# Altium PCB FPGA_Peripheral_Board.PcbDoc (part 3 of 5)
Units mm, origin at the board's own origin, x right, y up, seen from the top; angles counter-clockwise.
Board outline 78.8 x 69 mm, 4 copper layers (Top Layer, Int1 (GND), Int2 (PWR), Bottom Layer), stack 1.508 mm thick; 111 components, 280 nets, 1262 pads, 728 vias.
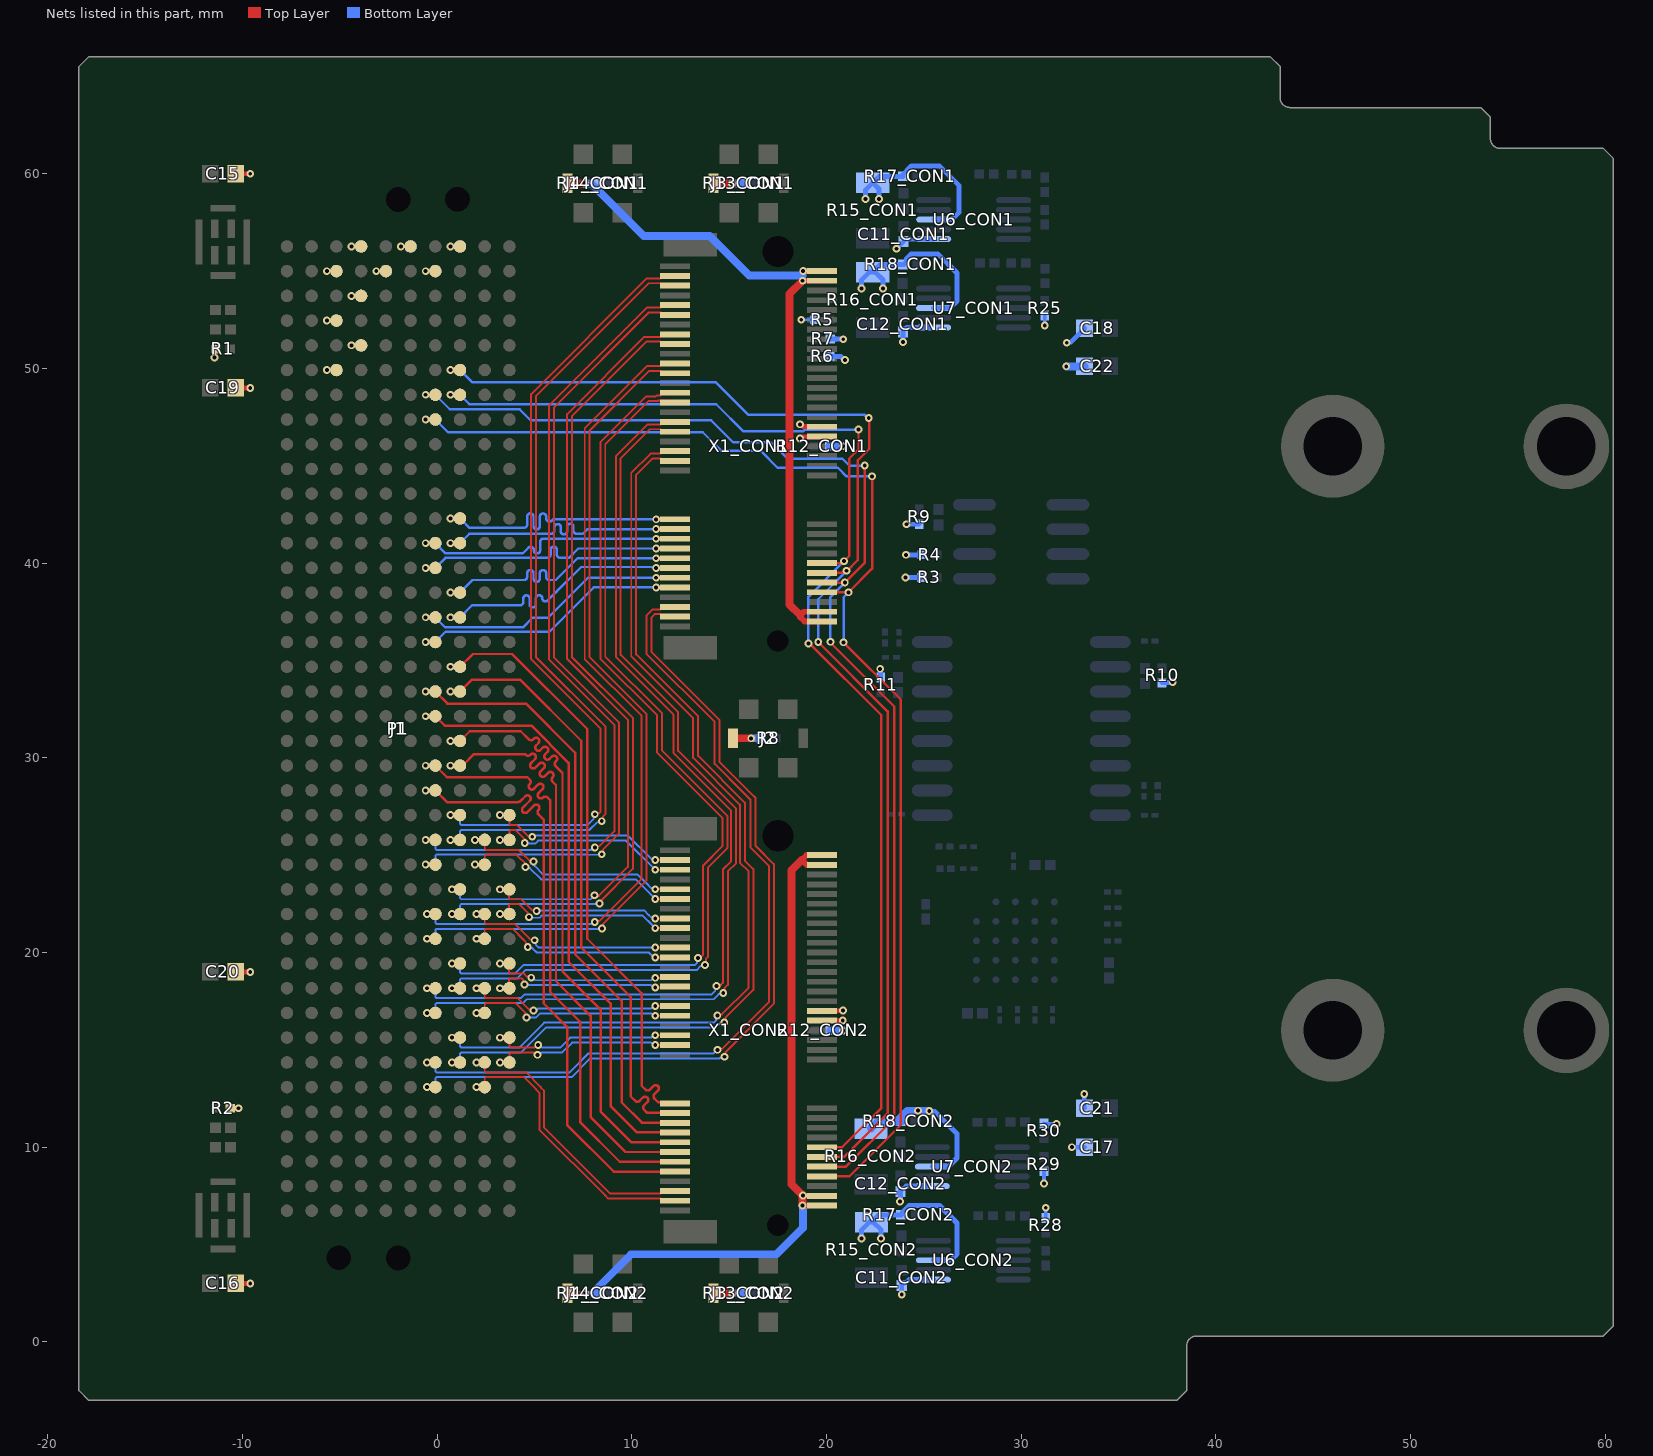
[diagram p4: the nets of this part, all layers, seen from the top]

## Via types
v1: diameter 0.4, hole 0.2, Top Layer to Bottom Layer, tented both sides, 713 vias
v2: diameter 3.5, hole 2.2, Top Layer to Bottom Layer, 11 vias
v3: diameter 5, hole 2.7, Top Layer to Bottom Layer, tented both sides, 2 vias
v4: diameter 3, hole 2.7, Top Layer to Bottom Layer, 1 vias
v5: diameter 3, hole 2.7, Top Layer to Bottom Layer, tented both sides, 1 vias

## Nets (pads, with @x,y where several pads share a name; then routed paths per layer and width w, separated by ;. In a path a pad name is that pad's centre, name@x,y a point inside that pad or via, vN(x,y) a via of type N, cw(c..) or ccw(c..) an arc to the next point about the centre after c; other vN are vias at no path point) (continued)
CON1_GP_D_P5: (continued)
  Bottom Layer w0.1: P1.H13@1.175,21.975 1.175,22.426 1.234,22.485 8.315,22.485 v1(8.34,22.509)
  other v1: 0.763,21.975
CON1_GP_D_P6: J1.G15 P1.G15 X1_CON1.65 | length 42
  Top Layer w0.1: v1(8.454,25.046) 8.511,25.104 8.511,25.281 9.352,26.121 9.352,31.799 6.003,35.148 6.003,47.996 10.881,52.875 11.475,52.875 11.6,52.75 X1_CON1.65@12.225,52.75
  Bottom Layer w0.1: P1.G15@-0.095,24.515 -0.095,24.966 -0.036,25.025 7.7,25.025 7.705,25.02 8.427,25.02 v1(8.454,25.046)
  other v1: -0.59,24.515
CON1_GP_D_P7: J1.H16 P1.H16 X1_CON1.71 | length 40.9
  Top Layer w0.1: v1(8.454,26.746) 8.511,26.804 8.511,26.981 8.65,27.12 8.65,31.602 5.075,35.177 5.075,48.582 10.868,54.375 11.475,54.375 11.6,54.25 X1_CON1.71@12.225,54.25
  Bottom Layer w0.1: P1.H16@1.175,25.785 1.175,26.236 1.234,26.295 7.825,26.295 8.219,26.689 8.396,26.689 v1(8.454,26.746)
  other v1: 0.68,25.785
CON1_GP_S0: J1.G24 P1.G24 X1_CON1.9 | length 13.5
  Top Layer w0.125: v1(11.25,38.75) X1_CON1.9@12.225,38.75
  Bottom Layer w0.125: P1.G24@-0.095,35.945 0.436,36.476 5.768,36.476 8.042,38.75 v1(11.25,38.75)
  other v1: -0.59,35.945
CON1_GP_S1: J1.G25 P1.G25 X1_CON1.11 | length 13.6
  Top Layer w0.125: v1(11.25,39.25) X1_CON1.11@12.225,39.25
  Bottom Layer w0.125: P1.G25@-0.095,37.215 0.419,36.701 4.408,36.701 4.899,37.192 5.69,37.192 7.748,39.25 v1(11.25,39.25)
  other v1: -0.59,37.215
CON1_GP_S2: J1.H25 P1.H25 X1_CON1.13 | length 13.6
  Top Layer w0.125: v1(11.25,39.75) X1_CON1.13@12.225,39.75
  Bottom Layer w0.125: P1.H25@1.175,37.215 1.793,37.833 4.2,37.833 4.263,37.833 ccw(c4.263,37.996) 4.425,37.996 4.425,38.182 cw(c4.588,38.182) 4.588,38.345 cw(c4.588,38.182) 4.75,38.182 4.75,37.884 ccw(c4.913,37.884) 4.913,37.721 ccw(c4.913,37.884) 5.075,37.884 5.075,38.192 cw(c5.238,38.192) 5.238,38.355 cw(c5.238,38.192) 5.4,38.192 ccw(c5.563,38.192) 5.677,38.077 6.11,38.51 7.4,39.8 11.037,39.8 11.042,39.794 11.206,39.794 v1(11.25,39.75)
  other v1: 0.68,37.215
CON1_GP_S3: J1.H26 P1.H26 X1_CON1.15 | length 13.4
  Top Layer w0.125: v1(11.25,40.25) X1_CON1.15@12.225,40.25
  Bottom Layer w0.125: P1.H26@1.175,38.485 1.822,39.132 4.4,39.132 4.463,39.132 ccw(c4.463,39.295) 4.625,39.295 4.625,39.478 cw(c4.788,39.478) 4.788,39.641 cw(c4.788,39.478) 4.95,39.478 4.95,39.208 ccw(c5.113,39.208) 5.113,39.045 ccw(c5.113,39.208) 5.275,39.208 5.275,39.478 cw(c5.438,39.478) 5.438,39.641 cw(c5.438,39.478) 5.6,39.478 5.6,39.295 ccw(c5.763,39.295) 5.763,39.132 6.002,39.132 6.093,39.132 7.21,40.25 v1(11.25,40.25)
  other v1: 0.68,38.485
CON1_GP_S4: J1.G27 P1.G27 X1_CON1.17 | length 13.6
  Top Layer w0.125: v1(11.25,40.75) X1_CON1.17@12.225,40.75
  Bottom Layer w0.125: P1.G27@-0.095,39.755 0.42,40.27 5.6,40.27 5.663,40.27 ccw(c5.663,40.433) 5.825,40.433 5.825,40.676 cw(c5.988,40.676) 5.988,40.838 cw(c5.988,40.676) 6.15,40.676 6.15,40.433 ccw(c6.313,40.433) 6.313,40.27 6.77,40.27 7.25,40.75 v1(11.25,40.75)
  other v1: -0.59,39.755
CON1_GP_S5: J1.G28 P1.G28 X1_CON1.19 | length 13.5
  Top Layer w0.125: v1(11.25,41.25) X1_CON1.19@12.225,41.25
  Bottom Layer w0.125: P1.G28@-0.095,41.025 0.43,40.5 4.4,40.5 4.497,40.597 4.688,40.788 cw(c4.803,40.673) 4.966,40.673 4.966,40.658 ccw(c5.128,40.658) 5.128,40.495 ccw(c5.128,40.658) 5.291,40.658 5.291,41.087 cw(c5.453,41.087) 5.453,41.25 5.703,41.25 v1(11.25,41.25)
  other v1: -0.59,41.025
CON1_GP_S6: J1.H28 P1.H28 X1_CON1.21 | length 12.9
  Top Layer w0.125: v1(11.25,41.75) X1_CON1.21@12.225,41.75
  Bottom Layer w0.125: P1.H28@1.175,41.025 1.657,41.507 5.8,41.507 5.863,41.507 ccw(c5.863,41.67) 6.025,41.67 6.025,41.844 cw(c6.188,41.844) 6.188,42.007 cw(c6.188,41.844) 6.35,41.844 6.35,41.637 ccw(c6.513,41.637) 6.513,41.475 ccw(c6.513,41.637) 6.675,41.637 6.675,41.862 cw(c6.838,41.862) 6.838,42.025 cw(c6.838,41.862) 7,41.862 7,41.67 ccw(c7.163,41.67) 7.163,41.507 7.478,41.507 7.486,41.507 7.71,41.731 11.231,41.731 v1(11.25,41.75)
  other v1: 0.68,41.025
CON1_GP_S7: J1.H29 P1.H29 X1_CON1.23 | length 13.6
  Top Layer w0.125: v1(11.25,42.25) X1_CON1.23@12.225,42.25
  Bottom Layer w0.125: P1.H29@1.175,42.295 1.268,42.295 1.268,42.202 1.657,41.812 4.4,41.812 4.463,41.812 ccw(c4.463,41.975) 4.625,41.975 4.625,42.39 cw(c4.788,42.39) 4.788,42.553 cw(c4.788,42.39) 4.95,42.39 4.95,41.895 ccw(c5.113,41.895) 5.113,41.732 ccw(c5.113,41.895) 5.275,41.895 5.275,42.388 cw(c5.438,42.388) 5.438,42.551 cw(c5.438,42.388) 5.6,42.388 5.6,42.292 ccw(c5.763,42.292) 5.877,42.177 5.95,42.25 6.175,42.25 6.4,42.25 v1(11.25,42.25)
  other v1: 0.68,42.295
CON2_GP_D_N0: J1.J7 P1.J7 X1_CON2.5 | length 14
  Top Layer w0.1: J1.J7@2.445,14.355 2.445,13.904 2.504,13.845 4.567,13.845 5.332,13.08 5.332,13.063 5.5,12.895 5.5,11 8.7,7.8 8.875,7.625 11.475,7.625 11.6,7.75 X1_CON2.5@12.225,7.75
  other v1: 2.02,14.355
CON2_GP_D_N1: J1.K8 P1.K8 X1_CON2.37 | length 9.4
  Top Layer w0.1: J1.K8@3.715,15.625 3.715,15.174 3.774,15.115 4.463,15.115 4.467,15.119 4.984,15.119 5.108,15.244 v1(5.189,15.244) ; v1(11.2,15.75) X1_CON2.37@12.225,15.75
  Bottom Layer w0.1: v1(5.189,15.244) 5.271,15.244 5.395,15.119 5.772,15.119 5.776,15.115 6.315,15.115 6.825,15.625 10.994,15.625 11.119,15.75 v1(11.2,15.75)
  other v1: 3.23,15.625
CON2_GP_D_N2: J1.J10 P1.J10 X1_CON2.43 | length 10.6
  Top Layer w0.1: J1.J10@2.445,18.165 2.445,17.714 2.504,17.655 4.131,17.655 4.711,17.075 4.888,17.075 v1(4.946,17.017) ; v1(11.2,17.25) X1_CON2.43@12.225,17.25
  Bottom Layer w0.1: v1(4.946,17.017) 5.003,17.075 5.145,17.075 5.196,17.125 10.994,17.125 11.119,17.25 v1(11.2,17.25)
  other v1: 2.02,18.165
CON2_GP_D_N3: J1.K11 P1.K11 X1_CON2.49 | length 9.2
  Top Layer w0.1: J1.K11@3.715,19.435 3.7,19.42 3.7,18.965 3.74,18.925 4.094,18.925 4.097,18.928 4.436,18.928 4.601,18.764 4.778,18.764 v1(4.835,18.706) ; v1(11.2,18.7) 12.175,18.7 X1_CON2.49@12.225,18.75
  Bottom Layer w0.1: v1(4.835,18.706) 4.912,18.706 5.044,18.575 10.994,18.575 11.119,18.7 v1(11.2,18.7)
  other v1: 3.23,19.435
CON2_GP_D_N4: J1.J13 P1.J13 X1_CON2.55 | length 10.8
  Top Layer w0.1: J1.J13@2.445,21.975 2.445,21.565 2.445,21.524 2.504,21.465 3.989,21.465 4.708,20.746 4.717,20.737 4.776,20.678 v1(5.009,20.632) ; v1(11.2,20.25) X1_CON2.55@12.225,20.25
  Bottom Layer w0.1: v1(5.009,20.632) 5.066,20.574 5.066,20.397 5.213,20.25 v1(11.2,20.25)
  other v1: 2.02,21.975
CON2_GP_D_N5: J1.K14 P1.K14 X1_CON2.61 | length 9.4
  Top Layer w0.1: J1.K14@3.715,23.245 3.7,23.23 3.7,22.775 3.74,22.735 4.315,22.735 4.9,22.15 5.098,22.15 v1(5.113,22.135) ; v1(11.2,21.75) X1_CON2.61@12.225,21.75
  Bottom Layer w0.1: v1(5.113,22.135) 5.138,22.159 10.644,22.159 10.879,21.924 10.996,21.807 11.143,21.807 v1(11.2,21.75)
  other v1: 3.23,23.245
CON2_GP_D_N6: J1.J16 P1.J16 X1_CON2.67 | length 11.3
  Top Layer w0.1: J1.J16@2.445,25.785 2.445,25.334 2.504,25.275 4.179,25.275 4.877,24.577 4.877,24.608 v1(4.944,24.675) ; v1(11.2,23.25) X1_CON2.67@12.225,23.25
  Bottom Layer w0.1: v1(4.944,24.675) 5.002,24.618 5.002,24.446 5.448,24 10.304,24 10.753,23.551 10.996,23.307 11.143,23.307 v1(11.2,23.25)
  other v1: 1.95,25.785
CON2_GP_D_N7: J1.K17 P1.K17 X1_CON2.73 | length 9.8
  Top Layer w0.1: J1.K17@3.715,27.055 3.715,26.604 3.774,26.545 4.107,26.545 4.691,25.961 4.868,25.961 v1(4.885,25.945) ; v1(11.2,24.75) X1_CON2.73@12.225,24.75
  Bottom Layer w0.1: v1(4.885,25.945) 4.94,26 9.804,26 10.996,24.807 11.143,24.807 v1(11.2,24.75)
  other v1: 3.22,27.055
CON2_GP_D_P0: J1.J6 P1.J6 X1_CON2.3 | length 14
  Top Layer w0.1: J1.J6@2.445,13.085 2.445,13.536 2.504,13.595 4.464,13.595 5.082,12.977 5.082,12.959 5.25,12.791 5.25,10.896 8.625,7.521 8.771,7.375 11.475,7.375 11.6,7.25 X1_CON2.3@12.225,7.25
  other v1: 2.02,13.085
CON2_GP_D_P1: J1.K7 P1.K7 X1_CON2.35 | length 9.4
  Top Layer w0.1: J1.K7@3.715,14.355 3.715,14.806 3.774,14.865 4.566,14.865 4.571,14.869 4.949,14.869 5.073,14.745 v1(5.154,14.745) ; v1(11.2,15.25) X1_CON2.35@12.225,15.25
  Bottom Layer w0.1: v1(5.154,14.745) 5.236,14.745 5.36,14.869 5.668,14.869 5.672,14.865 6.419,14.865 6.929,15.375 10.994,15.375 11.119,15.25 v1(11.2,15.25)
  other v1: 3.23,14.355
CON2_GP_D_P2: J1.J9 P1.J9 X1_CON2.41 | length 10.8
  Top Layer w0.1: J1.J9@2.445,16.895 2.445,17.346 2.504,17.405 4.027,17.405 4.535,16.898 4.535,16.721 v1(4.592,16.664) ; v1(11.2,16.75) X1_CON2.41@12.225,16.75
  Bottom Layer w0.1: v1(4.592,16.664) 5.088,16.664 5.299,16.875 10.994,16.875 11.119,16.75 v1(11.2,16.75)
  other v1: 2.02,16.895
CON2_GP_D_P3: J1.K10 P1.K10 X1_CON2.47 | length 9.3
  Top Layer w0.1: J1.K10@3.715,18.165 3.7,18.18 3.7,18.635 3.74,18.675 4.197,18.675 4.201,18.678 4.333,18.678 4.424,18.587 4.424,18.41 v1(4.481,18.353) ; v1(11.2,18.2) 12.175,18.2 X1_CON2.47@12.225,18.25
  Bottom Layer w0.1: v1(4.481,18.353) 4.509,18.325 10.994,18.325 11.119,18.2 v1(11.2,18.2)
  other v1: 3.23,18.165
CON2_GP_D_P4: J1.J12 P1.J12 X1_CON2.53 | length 10.9
  Top Layer w0.1: J1.J12@2.445,20.705 2.445,21.156 2.504,21.215 3.885,21.215 4.458,20.642 4.516,20.584 v1(4.655,20.278) ; v1(11.2,19.75) X1_CON2.53@12.225,19.75
  Bottom Layer w0.1: v1(4.655,20.278) 4.712,20.221 4.889,20.221 5.11,20 10.869,20 11.119,19.75 v1(11.2,19.75)
  other v1: 2.02,20.705
CON2_GP_D_P5: J1.K13 P1.K13 X1_CON2.59 | length 9.7
  Top Layer w0.1: J1.K13@3.715,21.975 3.7,21.99 3.7,22.445 3.74,22.485 4.211,22.485 4.723,21.973 4.723,21.826 v1(4.712,21.815) ; v1(11.2,21.25) X1_CON2.59@12.225,21.25
  Bottom Layer w0.1: v1(4.712,21.815) 4.742,21.785 5.258,21.785 5.383,21.909 10.541,21.909 10.629,21.821 10.961,21.489 v1(11.2,21.25)
  other v1: 3.23,21.975
CON2_GP_D_P6: J1.J15 P1.J15 X1_CON2.65 | length 11.3
  Top Layer w0.1: J1.J15@2.445,24.515 2.445,24.966 2.504,25.025 4.075,25.025 v1@4.622,24.478 ; v1(4.534,24.39) v1@4.544,24.4 ; v1(11.2,22.75) X1_CON2.65@12.225,22.75
  Bottom Layer w0.1: v1(4.534,24.39) 4.591,24.332 4.762,24.332 5.344,23.75 10.2,23.75 10.503,23.447 10.961,22.989 v1(11.2,22.75)
  other v1: 1.95,24.515
CON2_GP_D_P7: J1.K16 P1.K16 X1_CON2.71 | length 10.1
  Top Layer w0.1: J1.K16@3.715,25.785 3.715,26.236 3.774,26.295 4.003,26.295 4.514,25.784 4.514,25.64 v1(4.499,25.625) ; v1(11.2,24.25) X1_CON2.71@12.225,24.25
  Bottom Layer w0.1: v1(4.499,25.625) v1@4.58,25.625 ; v1@4.58,25.595 5.03,25.595 5.185,25.75 9.7,25.75 v1(11.2,24.25)
  other v1: 3.22,25.785
CON2_GP_S0: J1.G18 P1.G18 X1_CON2.9 | length 30.9
  Top Layer w0.125: J1.G18@-0.095,28.325 0.507,27.723 4.023,27.723 4.111,27.723 ccw(c4.111,28) 4.307,27.803 4.528,28.024 cw(c4.642,27.909) 4.757,28.024 cw(c4.642,27.909) 4.757,27.794 4.406,27.443 ccw(c4.52,27.328) 4.406,27.213 ccw(c4.52,27.328) 4.635,27.213 4.976,27.554 cw(c5.091,27.439) 5.206,27.554 cw(c5.091,27.439) 5.206,27.324 ccw(c5.321,27.209) 5.206,27.094 5.349,26.951 5.393,26.907 5.476,26.824 5.476,17.384 6.677,16.183 6.677,11.138 9.075,8.74 12.215,8.74 X1_CON2.9@12.225,8.75
  other v1: -0.59,28.325
CON2_GP_S1: J1.G19 P1.G19 X1_CON2.11 | length 30.9
  Top Layer w0.125: J1.G19@-0.095,29.595 0.5,29 4.442,29 4.633,29 4.754,28.879 cw(c4.639,28.764) 4.754,28.649 4.75,28.645 ccw(c4.865,28.531) 4.75,28.416 ccw(c4.865,28.53) 4.98,28.416 5.187,28.622 cw(c5.302,28.507) 5.417,28.622 cw(c5.302,28.507) 5.417,28.393 5.214,28.189 ccw(c5.328,28.074) 5.214,27.959 ccw(c5.328,28.074) 5.443,27.959 cw(c5.558,27.845) 5.673,27.959 5.801,27.832 5.801,27.572 5.801,17.987 7.342,16.446 7.342,11.289 9.378,9.253 12.222,9.253 X1_CON2.11@12.225,9.25
  other v1: -0.59,29.595
CON2_GP_S2: J1.H19 P1.H19 X1_CON2.13 | length 30.9
  Top Layer w0.125: J1.H19@1.175,29.595 1.295,29.595 1.891,30.191 4.509,30.191 4.553,30.147 ccw(c4.668,30.262) 4.783,30.147 4.794,30.159 cw(c4.909,30.044) 5.024,30.159 cw(c4.909,30.044) 5.024,29.929 4.826,29.731 ccw(c4.941,29.616) 4.826,29.501 ccw(c4.941,29.616) 5.056,29.501 5.254,29.699 cw(c5.369,29.584) 5.484,29.699 cw(c5.369,29.584) 5.484,29.469 5.314,29.299 ccw(c5.429,29.184) 5.314,29.07 ccw(c5.429,29.184) 5.544,29.07 5.702,29.228 cw(c5.817,29.113) 5.932,29.228 cw(c5.817,29.113) 5.932,28.998 ccw(c6.047,28.883) 5.932,28.768 6.083,28.617 6.106,28.594 6.106,28.552 6.106,18.524 7.882,16.748 7.882,11.551 9.68,9.754 12.221,9.754 X1_CON2.13@12.225,9.75
  other v1: 0.68,29.595
CON2_GP_S3: J1.H20 P1.H20 X1_CON2.15 | length 30.8
  Top Layer w0.125: J1.H20@1.175,30.865 1.676,31.366 4.297,31.366 4.665,30.997 4.709,30.953 ccw(c4.824,31.068) 4.939,30.953 4.967,30.981 cw(c5.082,30.866) 5.196,30.981 cw(c5.082,30.866) 5.196,30.751 5.088,30.643 ccw(c5.203,30.528) 5.088,30.413 ccw(c5.203,30.528) 5.318,30.413 5.426,30.521 cw(c5.541,30.406) 5.656,30.521 cw(c5.541,30.406) 5.656,30.291 5.548,30.183 ccw(c5.663,30.068) 5.548,29.953 ccw(c5.663,30.068) 5.778,29.953 5.886,30.061 cw(c6.001,29.947) 6.116,30.061 cw(c6.001,29.947) 6.116,29.832 6.088,29.804 ccw(c6.203,29.689) 6.088,29.574 6.437,29.225 6.437,29.037 6.437,19.025 8.41,17.052 8.41,11.813 9.966,10.257 11.168,10.257 ; 11.19,10.254 12.221,10.254 X1_CON2.15@12.225,10.25
  other v1: 0.68,30.865
CON2_GP_S4: J1.G21 P1.G21 X1_CON2.17 | length 30.9
  Top Layer w0.125: J1.G21@-0.095,32.135 0.387,31.652 4.843,31.652 6.754,29.741 6.754,19.523 8.924,17.354 8.924,12.089 10.257,10.757 12.218,10.757 X1_CON2.17@12.225,10.75
  Bottom Layer w0.125: v1(-0.59,32.135) P1.G21@-0.095,32.135 -0.035,32.135 P1.G21@-0.035,32.075
CON2_GP_S5: J1.G22 P1.G22 X1_CON2.19 | length 30.6
  Top Layer w0.125: J1.G22@-0.095,33.405 0.523,32.787 4.558,32.787 7.087,30.258 7.087,19.908 9.479,17.516 9.479,12.299 10.516,11.262 12.213,11.262 X1_CON2.19@12.225,11.25
  other v1: -0.59,33.405
CON2_GP_S6: J1.H22 P1.H22 X1_CON2.21 | length 30.6
  Top Layer w0.125: J1.H22@1.175,33.405 1.79,34.02 4.254,34.02 7.401,30.873 7.401,20.253 9.945,17.709 9.945,12.61 10.127,12.428 10.171,12.384 ccw(c10.286,12.499) 10.401,12.384 10.564,12.547 cw(c10.679,12.432) 10.794,12.547 cw(c10.679,12.432) 10.794,12.317 10.63,12.154 ccw(c10.745,12.04) 10.631,11.925 10.75,11.806 10.794,11.761 12.214,11.761 X1_CON2.21@12.225,11.75
  other v1: 0.68,33.405
CON2_GP_S7: J1.H23 P1.H23 X1_CON2.23 | length 30.9
  Top Layer w0.125: J1.H23@1.175,34.675 1.833,35.333 3.851,35.333 7.707,31.477 7.707,20.706 10.51,17.902 10.51,13.149 10.656,13.003 10.701,12.958 ccw(c10.816,13.073) 10.93,12.958 11.112,13.14 cw(c11.227,13.025) 11.342,13.14 cw(c11.227,13.025) 11.342,12.91 11.16,12.729 ccw(c11.275,12.614) 11.16,12.499 11.303,12.356 11.347,12.312 12.163,12.312 X1_CON2.23@12.225,12.25
  other v1: 0.68,34.675
CON_I2S_CLK: J1.G33 P1.G33 X1_CON1.8 X1_CON2.8 | length 65.3
  Top Layer w0.125: X1_CON2.8@19.775,8.5 21.164,8.5 23.813,11.149 23.813,32.991 v1(20.874,35.93) ; X1_CON1.8@19.775,38.5 v1(21.13,38.5) 22.345,39.714 22.345,44.444 v1(22.331,44.457)
  Bottom Layer w0.125: P1.G33@-0.095,47.375 0.561,46.719 13.639,46.719 14.583,45.775 16.609,45.775 17.484,44.9 20.583,44.9 21.026,44.457 v1(22.331,44.457) ; v1(20.874,35.93) 20.874,38.244 v1(21.13,38.5)
  other v1: -0.59,47.375
CON_I2S_IN: J1.H34 P1.H34 X1_CON1.14 X1_CON2.14 | length 63.7
  Top Layer w0.125: v1(19.067,35.871) 19.13,35.871 22.818,32.183 22.818,12.017 20.8,10 X1_CON2.14@19.775,10 ; X1_CON1.14@19.775,40 v1@20.8,40 ; v1(20.9,40.1) 21.168,40.368 21.168,45.372 21.642,45.846 v1(21.642,46.859)
  Bottom Layer w0.125: P1.H34@1.175,48.645 1.657,48.162 14.338,48.162 15.734,46.766 18.794,46.766 18.887,46.859 v1(21.642,46.859) ; v1(19.067,35.871) 19.067,38.267 v1(20.9,40.1)
  other v1: 0.68,48.645
CON_I2S_OUT: J1.H35 P1.H35 X1_CON1.12 X1_CON2.12 | length 65.8
  Top Layer w0.125: v1(19.573,35.95) 23.139,32.383 23.139,11.739 20.9,9.5 X1_CON2.12@19.775,9.5 ; X1_CON1.12@19.775,39.5 v1@20.95,39.5 ; v1@21.043,39.593 21.601,40.151 21.601,45.273 22.2,45.872 22.2,47.427 v1(22.169,47.458)
  Bottom Layer w0.125: P1.H35@1.175,49.915 1.812,49.278 14.322,49.278 15.989,47.611 21.958,47.611 22.111,47.458 v1(22.169,47.458) ; v1(19.573,35.95) 19.573,38.146 21.027,39.6 v1(21.027,39.61)
  other v1: 0.68,49.915
CON_I2S_WS: J1.G34 P1.G34 X1_CON1.10 X1_CON2.10 | length 65.1
  Top Layer w0.125: X1_CON2.10@19.775,9 21,9 23.485,11.485 23.485,32.622 20.199,35.907 v1(20.199,35.958) ; X1_CON1.10@19.775,39 v1(20.939,39) 21.969,40.029 21.969,45.003 v1(21.963,45.008)
  Bottom Layer w0.125: P1.G34@-0.095,48.645 0.65,47.9 4.235,47.9 4.797,47.339 14.074,47.339 15.204,46.208 17.148,46.208 17.991,45.366 20.809,45.366 21.167,45.008 v1(21.963,45.008) ; v1(20.199,35.958) 20.199,37.599 ; 20.2,37.6 20.2,38.261 v1(20.939,39)
  other v1: -0.59,48.645
FMC_3V3: C11_CON1.2 C11_CON2.2 C12_CON1.2 C12_CON2.2 C15.2 C16.2 C17.2 C18.2 J1.C39 J1.D36 J1.D38 J1.D40 P1.C39 P1.D36 P1.D38 P1.D40 R10.2 R16_CON1.1 R16_CON2.1 R18_CON1.2 R18_CON2.2 R25.1 R28.1 R29.1 R30.1 U6_CON1.6 U6_CON2.6 U7_CON1.6 U7_CON1.8 U7_CON2.6 U7_CON2.8 | length 33.5
  Top Layer w0.25: C16.2@-10.35,3 v1(-9.6,3) ; C15.2@-10.35,60 v1(-9.6,60)
  Bottom Layer w0.2: v1(23.595,56.146) 23.615,56.146 23.96,56.491 C11_CON1.2@23.96,56.511 24.072,56.623 25.487,56.623 U6_CON1.6@25.506,56.643 ; v1(31.166,8.134) R29.1@31.166,8.762 ; R30.1@31.166,11.215 31.18,11.2 31.803,11.2 v1(31.817,11.186) ; v1(31.206,52.206) R25.1@31.206,52.712 ; R28.1@31.262,6.358 v1(31.262,6.891)
  Bottom Layer w0.25: v1(21.8,54.1) 21.8,54.547 22.2,54.947 R16_CON1.1@22.374,54.947 ; v1(22.9,54.1) 22.9,54.547 22.5,54.947 R16_CON1.1@22.374,54.947 ; v1(23.778,7.215) 23.79,7.227 23.79,7.721 C12_CON2.2@23.803,7.734 23.803,7.754 23.938,7.889 23.973,7.889 24.085,8 U7_CON2.6@25.432,8 ; v1(23.863,2.437) C11_CON2.2@23.863,2.899 23.863,2.919 23.998,3.054 24.096,3.054 24.239,3.197 U6_CON2.6@25.492,3.197 ; v1(23.921,51.354) C12_CON1.2@23.922,51.879 23.922,51.899 24.123,52.1 U7_CON1.6@25.5,52.1 ; R18_CON1.2@23.948,55.342 R18_CON1.2@23.973,55.342 ; v1(25.276,11.865) 25.304,11.838 25.562,11.838 26.132,11.268 26.7,10.7 26.7,9.446 26.263,9.01 25.441,9.01 U7_CON2.8@25.432,9 ; U7_CON1.8@25.5,53.1 25.51,53.11 26.363,53.11 26.7,53.446 26.7,54.9 25.729,55.871 24.333,55.871 24.098,55.636 24.098,55.467 R18_CON1.2@23.973,55.342 ; v1(32.337,51.318) 32.366,51.346 32.553,51.346 33.25,52.044 C18.2@33.25,52.069 ; v1(32.6,10) C17.2@33.25,10 ; R10.2@37.235,33.854 37.253,33.872 37.76,33.872 v1(37.778,33.891) ; R16_CON1.1@22.374,54.947 22.77,55.342 R18_CON1.2@23.973,55.342
  Bottom Layer w0.4: R16_CON2.1@22.278,10.957 22.603,11.282 23.554,11.282 24.148,11.876 v1(24.7,11.876) 24.988,11.876 24.999,11.865 v1(25.276,11.865) ; R18_CON2.2@23.789,11.276 R18_CON2.2@23.839,11.326
  other v1: -4.395,51.185 -4.395,53.725 -5.665,54.995 -4.395,56.265
FMC_12V: J1.C35 J1.C37 P1.C35 P1.C37 R12_CON1.2 R12_CON2.2 | length 1.3
  Bottom Layer w0.4: R12_CON1.2@20.159,46 v1(20.85,46) ; R12_CON2.2@20.205,16 20.23,16 v1(20.85,16)
  other v1: -5.665,49.915 -5.665,52.455
FMC_ADJ: C19.2 C20.2 C21.2 C22.2 J1.E39 J1.F40 J1.G39 J1.H40 J2.2 P1.E39 P1.F40 P1.G39 P1.H40 R1.2 R2.2 R3.2 R4.2 R5.2 R6.2 R7.2 R8.2 R9.2 R11.2 R15_CON1.1 R15_CON2.1 R17_CON1.2 R17_CON2.2 U6_CON1.8 U6_CON2.8 | length 30.8
  Top Layer w0.125: v1(-11.434,50.556) -11.434,50.941 R1.2@-11.375,51 ; R2.2@-10.625,12 v1(-10.2,12)
  Top Layer w0.25: C20.2@-10.35,19 v1(-9.6,19) ; C19.2@-10.35,49 v1(-9.6,49)
  Top Layer w0.4: J2.2@15.2,31 v1(16.13,31)
  Bottom Layer w0.15: v1(18.7,52.499) 19.399,52.499 R5.2@19.404,52.494
  Bottom Layer w0.25: R6.2@20.16,50.614 20.737,50.614 20.923,50.427 v1(20.952,50.427) ; R7.2@20.187,51.515 20.197,51.506 20.848,51.506 v1(20.857,51.497) ; v1(21.803,5.305) 21.803,5.754 22.203,6.154 R15_CON2.1@22.315,6.154 ; v1(21.996,58.702) 21.996,59.159 R15_CON1.1@22.373,59.536 ; v1(22.696,58.702) 22.696,59.213 R15_CON1.1@22.373,59.536 ; v1(22.756,34.569) 22.768,34.557 22.768,34.109 R11.2@22.779,34.098 ; v1(22.803,5.305) 22.803,5.754 22.403,6.154 R15_CON2.1@22.315,6.154 ; R17_CON2.2@23.852,6.524 22.686,6.524 R15_CON2.1@22.315,6.154 ; R17_CON1.2@23.889,59.931 24.36,60.402 25.796,60.402 26.796,59.402 26.796,58.002 26.446,57.652 25.516,57.652 U6_CON1.8@25.506,57.643 ; R17_CON2.2@23.896,6.662 24.238,7.005 25.803,7.005 26.703,6.105 26.703,4.501 26.408,4.206 25.501,4.206 U6_CON2.8@25.492,4.197 ; R17_CON1.2@23.935,59.864 22.701,59.864 R15_CON1.1@22.373,59.536 ; v1(24.062,39.262) R3.2@24.907,39.262 ; v1(24.075,40.425) R4.2@24.916,40.425 ; v1(24.102,41.998) R9.2@24.757,41.998 ; v1(33.235,12.734) 33.235,12.015 C21.2@33.25,12
  Bottom Layer w0.4: v1(16.13,31) R8.2@16.625,31 ; v1(32.313,50.106) 32.319,50.1 C22.2@33.25,50.1
  other v1: -3.126,54.995 -0.59,54.995 -1.865,56.265 0.68,56.265
FMC_ADJ_CON_CON1: J3_CON1.1 R13_CON1.1 X1_CON1.40 X1_CON1.42 | length 3.8
  Top Layer w0.25: v1(18.643,46.403) 18.683,46.403 18.755,46.475 19.75,46.475 X1_CON1.40@19.775,46.5 ; v1(18.644,47.128) 18.685,47.128 18.788,47.025 19.75,47.025 X1_CON1.42@19.775,47
  Top Layer w0.4: J3_CON1.1@14.2,59.5 v1(15.149,59.5)
  Bottom Layer w0.4: v1(15.149,59.5) R13_CON1.1@15.625,59.5
FMC_ADJ_CON_CON2: J3_CON2.1 R13_CON2.1 X1_CON2.40 X1_CON2.42 | length 3.6
  Top Layer w0.25: X1_CON2.40@19.775,16.5 19.78,16.505 20.829,16.505 v1(20.834,16.511) ; X1_CON2.42@19.775,17 19.782,17.007 20.842,17.007 v1(20.849,17.014)
  Top Layer w0.4: J3_CON2.1@14.2,2.5 v1(15.149,2.5)
  Bottom Layer w0.4: v1(15.149,2.5) R13_CON2.1@15.625,2.5